# Allegro board SUB_GM7123C_RGB TO VGA_V1_0-0717-1408.brd
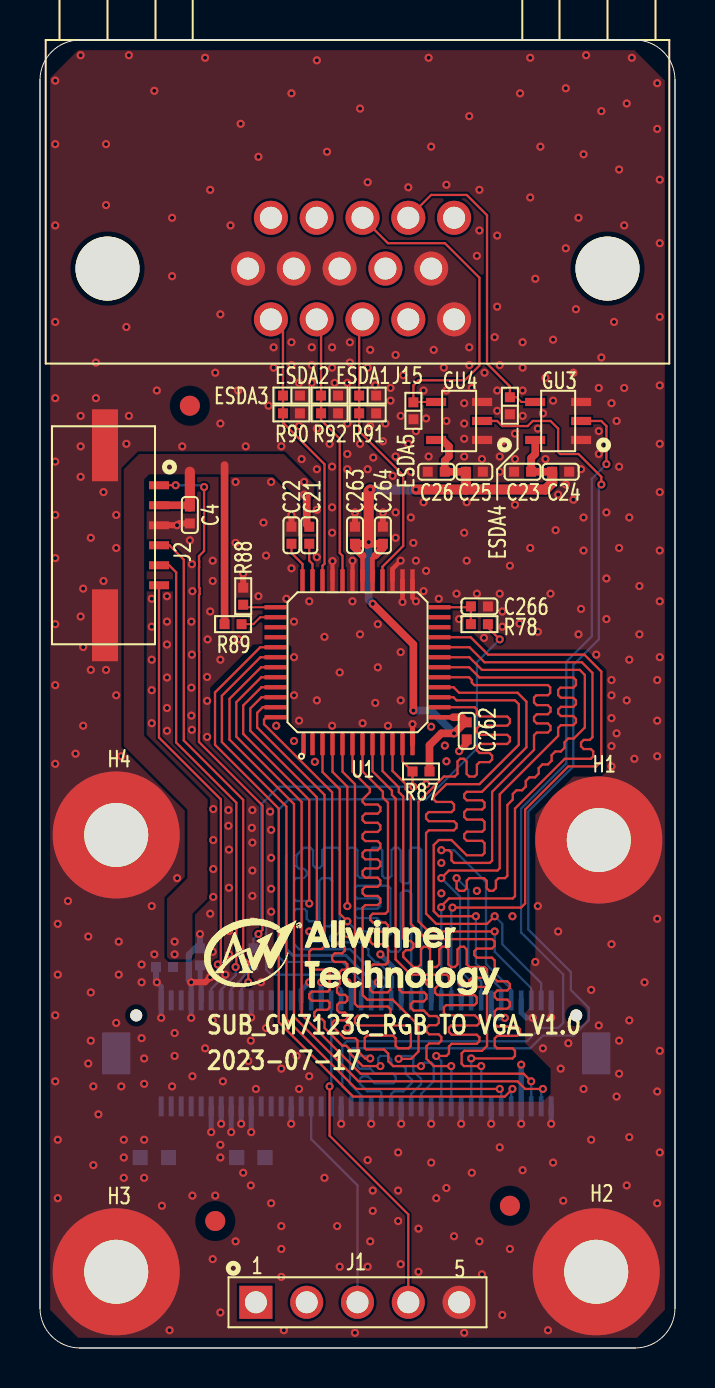
[diagram p0: board, top side]
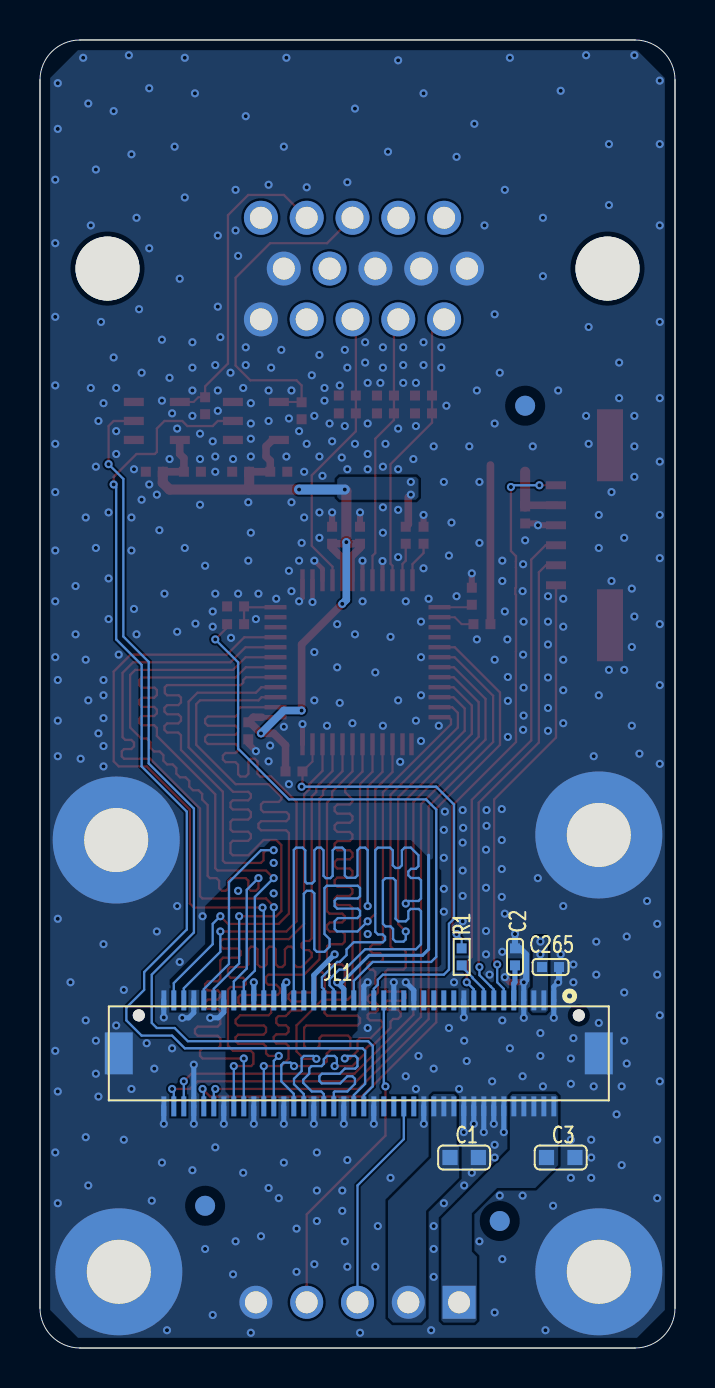
[diagram p1: board, bottom side, seen from below]

Outline 31.75 x 65.41 mm; copper layers: TOP, GND02, GND03, BOTTOM. Coordinates in mm from the lower left corner of the outline.
Outline path: 0,63.41 0,2 ; 0,63.41 arc(0.59,64.82) 2,65.41 ; 0,63.41 0,2 ; 0,2 arc(0.59,0.59) 2,0 ; 2,65.41 29.75,65.41 ; 2,65.41 29.75,65.41 ; 29.75,65.41 arc(31.16,64.82) 31.75,63.41 ; 2,0 29.75,0 ; 2,0 29.75,0 ; 29.75,0 arc(31.16,0.59) 31.75,2 ; 31.75,63.41 31.75,2 ; 31.75,63.41 31.75,2

## Design rules (mm)
net group LCD-CLK: nets LCD-CLK RGB/CLK
nets with their own width: min track width 0.305; nets GND

## Placement (name value [footprint] x y rotation side)
C1  22uF-16V  [C0603]  10.54 9.53 180 bottom
C2  100nF-16V  [C0402]  8 19.56 90 bottom
C3  22uF-25V  [C0603]  5.71 9.53 180 bottom
C4  4.7uF-16V  [C0402]  7.49 41.66 270 top
C21  100nF-16V  [C0402]  13.46 40.64 90 top
C22  100nF-16V  [C0402]  12.57 40.64 90 top
C23  100nF-16V  [C0402]  24.13 43.81 180 top
C24  10nF-16V  [C0402]  26.04 43.81 0 top
C25  100nF-16V  [C0402]  21.72 43.81 0 top
C26  10nF-16V  [C0402]  19.81 43.81 180 top
C262  100nF-16V  [C0402]  21.34 30.86 270 top
C263  100nF-16V  [C0402]  15.75 40.64 90 top
C264  10uFF-16V  [C0402]  17.14 40.64 90 top
C265  100nF-16V  [C0402]  6.22 19.05 180 bottom
C266  NC/10pF-16V  [C0402]  21.97 37.08 0 top
ESDA1  ESD9B5V-2/TR  [ESD0402]  16.38 47.62 0 top
ESDA2  ESD9B5V-2/TR  [ESD0402]  14.48 47.62 0 top
ESDA3  ESD9B5V-2/TR  [ESD0402]  12.57 47.62 0 top
ESDA4  ESD9B5V-2/TR  [ESD0402]  23.5 47.12 270 top
ESDA5  ESD9B5V-2/TR  [ESD0402]  18.67 46.86 270 top
GU3  NC7SZ125  [SOT5P95B160_292H145]  25.91 46.35 180 top
GU4  NC7SZ125  [SOT5P95B160_292H145]  20.95 46.35 180 top
H1  NC-HOLE  [MTH635D320]  27.94 25.4 0 top
H2  NC-HOLE  [MTH635D320]  27.81 3.81 0 top
H3  NC-HOLE  [MTH635D320]  3.81 3.81 0 top
H4  NC-HOLE  [MTH635D320]  3.81 25.65 0 top
J1  CON1X5-2.54-F-DIP  [SKT1_5P254B250_1290H850]  15.88 2.29 0 top
J2  CTP_CN  [FPC8P100B515_1090H340_B]  3.17 40.64 270 top
J15  DB-15F  [DB15P229B2175_3080H1255]  15.88 57.32 180 top
JL1  DF17(2.0)-80DP-0.5V  [SKT2_40P50B570_2500H350]  15.81 14.73 0 bottom
NOREF  -  []  -57.71 -63.22 0 top
NOREF#2  -  []  1.98 0 90 top
NOREF#3  -  []  0 2 0 top
NOREF#4  -  []  8.13 17.27 0 top
NOREF#5  -  [unnamed#2]  7.49 47.12 0 top
NOREF#6  -  [unnamed#2]  23.5 7.11 0 top
NOREF#7  -  [unnamed#2]  8.76 6.35 0 top
NOREF#8  -  [unnamed#2]  8.76 6.35 180 bottom
NOREF#9  -  [unnamed#2]  7.49 47.12 180 bottom
NOREF#10  -  [unnamed#2]  23.5 7.11 180 bottom
R1  0R  [R0402]  10.67 19.56 90 bottom
R78  0R  [R0402]  21.97 36.2 180 top
R87  1K  [R0402]  19.05 28.83 0 top
R88  530R  [R0402]  10.16 37.59 90 top
R89  4.7K  [R0402]  9.65 36.2 180 top
R90  75R  [R0402]  12.57 46.74 0 top
R91  75R  [R0402]  16.38 46.74 0 top
R92  75R  [R0402]  14.48 46.74 0 top
U1  GM7123C  [QFP48P50B700X700H170]  15.88 34.29 90 top

## Library data of the parts
C1-C3 C21-C26 C262-C265 = CAPACITOR_0: room: LVDS
C4 = C-C0402: room: EMMC
C266 = CAPACITOR_0: signal model: CAPACITOR_0_C0402_NC/10PF-16V_NC/10pF-16V; room: LVDS
ESDA1-ESDA5 = 1_1.5KE100A
GU3 GU4 = LP3985IM5-3_0.3
H1-H4 = HOLE
J1 = CON1X5-2.54-F-DIP
J2 = CTP_CN_2
J15 = DB-15_1
JL1 = DF17-3.0-80DS-0.5V
R1 = R-R0402-5%
R78 = R-R0603_1: signal model: R-R0603_1_R0402_0R_0R
R87-R92 = R-R0603
U1 = GM7123C

## Footprints (pads in the part's own frame, mm; a bottom-side part is the same pattern mirrored in y, then rotated)
C0402
  rect 0.5x0.5 smd: 1(-0.425,0) 2(0.425,0)
C0603
  rect 0.759x0.759 smd: 1(-0.71,0) 2(0.71,0)
DB15P229B2175_3080H1255
  round 3.2 hole 3.2 unplated: (-12.5,3.34) (12.5,3.34)
  round 1.7 hole 1.1: 1(4.33,5.88) 2(2.04,5.88) 3(-0.25,5.88) 4(-2.54,5.88) 5(-4.83,5.88) 6(5.475,3.34) 7(3.185,3.34) 8(0.895,3.34) 9(-1.395,3.34) 10(-3.685,3.34) 11(4.33,0.8) 12(2.04,0.8) 13(-0.25,0.8) 14(-2.54,0.8) 15(-4.83,0.8)
ESD0402
  rect 0.5x0.5 smd: 1(-0.425,0) 2(0.425,0)
FPC8P100B515_1090H340_B
  rect 0.4x1 smd: 1(-2.5,2.775) 2(-1.5,2.775) 3(-0.5,2.775) 4(0.5,2.775) 5(1.5,2.775) 6(2.5,2.775)
  rect 3.6x1.3 smd: 7(4.5,0.075) 8(-4.5,0.075)
MTH635D320
  round 6.35 hole 3.2: 1(0,0)
QFP48P50B700X700H170
  rect 1.1x0.22 smd: 1(-4.1,2.7) 2(-4.1,2.25) 3(-4.1,1.75) 4(-4.1,1.25) 5(-4.1,0.75) 6(-4.1,0.25) 7(-4.1,-0.25) 8(-4.1,-0.75) 9(-4.1,-1.25) 10(-4.1,-1.75) 11(-4.1,-2.25) 12(-4.1,-2.75) 25(4.1,-2.75) 26(4.1,-2.25) 27(4.1,-1.75) 28(4.1,-1.25) 29(4.1,-0.75) 30(4.1,-0.25) 31(4.1,0.25) 32(4.1,0.75) 33(4.1,1.25) 34(4.1,1.75) 35(4.1,2.25) 36(4.1,2.75)
  rect 0.22x1.1 smd: 13(-2.75,-4.1) 14(-2.25,-4.1) 15(-1.75,-4.1) 16(-1.25,-4.1) 17(-0.75,-4.1) 18(-0.25,-4.1) 19(0.25,-4.1) 20(0.75,-4.1) 21(1.25,-4.1) 22(1.75,-4.1) 23(2.25,-4.1) 24(2.75,-4.1) 37(2.75,4.1) 38(2.25,4.1) 39(1.75,4.1) 40(1.25,4.1) 41(0.75,4.1) 42(0.25,4.1) 43(-0.25,4.1) 44(-0.75,4.1) 45(-1.25,4.1) 46(-1.75,4.1) 47(-2.25,4.1) 48(-2.75,4.1)
R0402
  rect 0.5x0.5 smd: 1(-0.425,0) 2(0.425,0)
SKT1_5P254B250_1290H850
  rect 1.651x1.651 hole 1.1: 1(-5.08,0)
  round 1.651 hole 1.1: 2(-2.54,0) 3(0,0) 4(2.54,0) 5(5.08,0)
SKT2_40P50B570_2500H350
  round 0.6 hole 0.6 unplated: (-11,-1.9) (11,-1.9)
  rect 0.25x1 smd: 1(-9.75,-2.65) 2(-9.75,2.65) 3(-9.25,-2.65) 4(-9.25,2.65) 5(-8.75,-2.65) 6(-8.75,2.65) 7(-8.25,-2.65) 8(-8.25,2.65) 9(-7.75,-2.65) 10(-7.75,2.65) 11(-7.25,-2.65) 12(-7.25,2.65) 13(-6.75,-2.65) 14(-6.75,2.65) 15(-6.25,-2.65) 16(-6.25,2.65) 17(-5.75,-2.65) 18(-5.75,2.65) 19(-5.25,-2.65) 20(-5.25,2.65) 21(-4.75,-2.65) 22(-4.75,2.65) 23(-4.25,-2.65) 24(-4.25,2.65) 25(-3.75,-2.65) 26(-3.75,2.65) 27(-3.25,-2.65) 28(-3.25,2.65) 29(-2.75,-2.65) 30(-2.75,2.65) 31(-2.25,-2.65) 32(-2.25,2.65) 33(-1.75,-2.65) 34(-1.75,2.65) 35(-1.25,-2.65) 36(-1.25,2.65) 37(-0.75,-2.65) 38(-0.75,2.65) 39(-0.25,-2.65) 40(-0.25,2.65) 41(0.25,-2.65) 42(0.25,2.65) 43(0.75,-2.65) 44(0.75,2.65) 45(1.25,-2.65) 46(1.25,2.65) 47(1.75,-2.65) 48(1.75,2.65) 49(2.25,-2.65) 50(2.25,2.65) 51(2.75,-2.65) 52(2.75,2.65) 53(3.25,-2.65) 54(3.25,2.65) 55(3.75,-2.65) 56(3.75,2.65) 57(4.25,-2.65) 58(4.25,2.65) 59(4.75,-2.65) 60(4.75,2.65) 61(5.25,-2.65) 62(5.25,2.65) 63(5.75,-2.65) 64(5.75,2.65) 65(6.25,-2.65) 66(6.25,2.65) 67(6.75,-2.65) 68(6.75,2.65) 69(7.25,-2.65) 70(7.25,2.65) 71(7.75,-2.65) 72(7.75,2.65) 73(8.25,-2.65) 74(8.25,2.65) 75(8.75,-2.65) 76(8.75,2.65) 77(9.25,-2.65) 78(9.25,2.65) 79(9.75,-2.65) 80(9.75,2.65)
  rect 1.4x2.1 smd: 81(12,0) 82(-12,0)
SOT5P95B160_292H145
  rect 1x0.41 smd: 1(-1.15,0.95) 2(-1.15,0) 3(-1.15,-0.95) 4(1.15,-0.95) 5(1.15,0.95)
unnamed#2
  round 1 smd: 1(0,0)

## Nets
GND: C1.2 C2.2 C3.2 C4.2 C22.2 C23.2 C24.2 C25.2 C26.2 C262.2 C263.2 C264.2 C265.2 C266.2 ESDA1.2(CATHODE) ESDA2.2(CATHODE) ESDA3.2(CATHODE) ESDA4.2(CATHODE) ESDA5.2(CATHODE) GU3.1(/OE) GU3.3(GND) GU4.1(/OE) GU4.3(GND) H1.1 H2.1 H3.1 H4.1 J1.5 J2.3(GND) J2.7(GND0) J2.8(GND1) J15.5 J15.6 J15.7 J15.8 J15.10 JL1.1(P1) JL1.7(P7) JL1.12(P12) JL1.14(P14) JL1.16(P16) JL1.18(P18) JL1.19(P19) JL1.20(P20) JL1.28(P28) JL1.29(P29) JL1.33(P33) JL1.38(P38) JL1.39(P39) JL1.43(P43) JL1.44(P44) JL1.49(P49) JL1.50(P50) JL1.55(P55) JL1.56(P56) JL1.61(P61) JL1.62(P62) JL1.67(P67) JL1.68(P68) JL1.73(P73) JL1.74(P74) JL1.79(P79) JL1.80(P80) JL1.81(GND0) JL1.82(GND1) R88.2 R90.2 R91.2 R92.2 U1.12(SYNC) U1.25(GND0) U1.26(GND1) U1.27(IOB-) U1.31(IOG-) U1.33(IOR-)
VCC-5V: C1.1 J1.2 JL1.22(P22) JL1.24(P24) JL1.26(P26)
VCCIO-LCD1: C2.1 JL1.9(P9)
CTP-INT: J2.4(INT) JL1.17(P17)
CTP-RST: J2.1(RST) R1.2
CTP-SCK: J2.6(SCL) JL1.11(P11)
CTP-SDA: J2.5(SDA) JL1.13(P13)
DCIN-12V: C3.1 J1.1 JL1.2(P2) JL1.4(P4) JL1.6(P6) JL1.8(P8) JL1.10(P10)
GM7123C-3V3: C4.1 C21.2 C23.1 C24.1 C25.1 C26.1 C262.1 C263.1 C264.1 C265.1 GU3.5(VCC) GU4.5(VCC) J2.2(VCC) JL1.3(P3) JL1.5(P5) R87.2 R89.2 U1.13(VDD0) U1.29(VDD1) U1.30(VDD2)
LCD-BL-PWM: J1.4 JL1.35(P35)
LCD-BL-PWREN: J1.3 JL1.32(P32)
LCD-CLK: JL1.41(P41) R78.1
LCD-D0: JL1.75(P75) U1.14(B0)
LCD-D1: JL1.77(P77) U1.15(B1)
LCD-D2: JL1.69(P69) U1.16(B2)
LCD-D3: JL1.71(P71) U1.17(B3)
LCD-D4: JL1.63(P63) U1.18(B4)
LCD-D5: JL1.65(P65) U1.19(B5)
LCD-D6: JL1.57(P57) U1.20(B6)
LCD-D7: JL1.59(P59) U1.21(B7)
LCD-D8: JL1.51(P51) U1.3(G2)
LCD-D9: JL1.53(P53) U1.4(G3)
LCD-D10: JL1.54(P54) U1.5(G4)
LCD-D11: JL1.52(P52) U1.6(G5)
LCD-D12: JL1.60(P60) U1.7(G6)
LCD-D13: JL1.58(P58) U1.8(G7)
LCD-D14: JL1.66(P66) U1.9(G8)
LCD-D15: JL1.64(P64) U1.10(G9)
LCD-D16: JL1.72(P72) U1.41(R2)
LCD-D17: JL1.70(P70) U1.42(R3)
LCD-D18: JL1.78(P78) U1.43(R4)
LCD-D19: JL1.76(P76) U1.44(R5)
LCD-D20: JL1.47(P47) U1.45(R6)
LCD-D21: JL1.45(P45) U1.46(R7)
LCD-D22: JL1.48(P48) U1.47(R8)
LCD-D23: JL1.46(P46) U1.48(R9)
LCD-DE: JL1.37(P37) R87.1 U1.11(BLANK)
LCD-HSYNC: GU4.2(A) JL1.42(P42)
LCD-VSYNC: GU3.2(A) JL1.40(P40)
RGB/CLK: C266.1 R78.2 U1.24(CLK)
VGA-B: ESDA1.1(ANODE) J15.3 R91.1 U1.28(IOB+)
VGA-G: ESDA2.1(ANODE) J15.2 R92.1 U1.32(IOG+)
VGA-HSYNC: ESDA5.1(ANODE) GU4.4(Y) J15.13
VGA-R: ESDA3.1(ANODE) J15.1 R90.1 U1.34(IOR+)
VGA-VSYNC: ESDA4.1(ANODE) GU3.4(Y) J15.14
N34352813: C21.1 U1.35(COMP)
N34352829: C22.1 U1.36(VREF)
N34352843: R88.1 U1.37(RSET)
N34352862: R89.1 U1.38(PSAVE)
N34482451: JL1.15(P15) R1.1

Pads without a net: J15 4 9 11 12 15; JL1 21 23 25 27 30 31 34 36; NOREF#5 1; NOREF#6 1; NOREF#7 1; NOREF#8 1; NOREF#9 1; NOREF#10 1; U1 1 2 22 23 39 40

## Via types
v1: diameter 0.406, hole 0.203, TOP to BOTTOM, 537 vias

## Routing (per net, layer and track width the routed paths; a pad name or vN(x,y) marks a point on that pad's centre or on a via; arc(x,y) is an arc through that point)
GND: length 58.2
  TOP w0.203: U1.31 v1(15.63,39.37) ; U1.33 v1(14.63,39.35)
  TOP w0.229: U1.26 v1(18.12,37.3) ; U1.25 18.63,37.51 v1(18.8,37.34) ; U1.27 17.63,38.96 v1(18.03,39.37)
  TOP w0.254: U1.12 v1(18.63,31.2)
  TOP w0.305: C4.2 6.94,41.23 v1(6.85,41.14) J2.3 ; C22.2 v1(12.57,41.66) ; v1(20.95,29.84) 21.34,30.23 C262.2 ; v1(8.51,18.54) 8.26,18.29 v1(7.56,18.29) ; R88.2 v1(10.16,38.73) ; C264.2 v1(17.14,41.78) ; C263.2 v1(15.75,41.78)
  BOTTOM w0.152: v1(16.89,18.29) 16.64,18.29 15.29,19.63 12.62,19.63 12.32,19.94 12.32,24.64
  BOTTOM w0.254: JL1.67 22.56,16.78 22.83,16.51 v1(23.24,16.51) ; JL1.50 v1(18.06,11.21) ; v1(7.56,18.29) JL1.7 v1(7.56,16.51) ; v1(15.37,18.29) 15.56,18.09 JL1.39 ; v1(24.06,11.21) JL1.74 v1(24.06,14.17) ; JL1.44 v1(16.56,11.21) ; JL1.16 v1(9.56,10.79) ; JL1.29 13.06,17.89 v1(13.46,18.29) ; JL1.68 v1(22.56,11.21) ; v1(6.06,16.51) JL1.1 6.06,18.07 v1(5.84,18.29) ; JL1.73 24.06,16.76 24.31,16.51 v1(24.64,16.51) ; JL1.19 v1(10.56,16.53) ; JL1.33 v1(14.06,18.29) ; JL1.18 v1(10.06,11.21) ; JL1.49 18.06,18.64 v1(17.02,19.68) ; JL1.14 v1(9.06,11.21) ; JL1.56 v1(19.56,11.21) ; v1(21.06,18.29) JL1.61 ; JL1.12 v1(8.56,10.79) ; JL1.55 19.56,18.16 v1(19.43,18.29) ; JL1.38 v1(15.06,11.21) ; JL1.43 16.56,17.96 v1(16.89,18.29) ; JL1.28 v1(12.56,11.21) ; JL1.62 v1(21.06,11.21) ; JL1.80 v1(25.56,11.21) ; JL1.20 v1(10.56,10.79) ; JL1.79 v1(25.56,16.53)
  BOTTOM w0.305: v1(5.84,18.29) 5.8,18.33 C265.2 ; v1(8,20.7) C2.2 7.75,19.98 7.44,19.68 7.44,18.41 v1(7.56,18.29)
  vias: v1(0.76,63.37) v1(0.76,60.2) v1(0.76,56.13) v1(0.76,51.31) v1(0.76,47.5) v1(0.76,44.32) v1(0.76,41.66) v1(0.76,39.5) v1(0.76,36.2) v1(0.76,33.15) v1(0.76,29.21) v1(0.76,16.64) v1(0.76,13.34) v1(0.89,21.21) v1(0.89,18.67) v1(0.89,10.41) v1(0.89,7.49) v1(1.4,22.35) v1(1.78,29.72) v1(2.03,64.64) v1(2.03,46.61) v1(2.03,45.09) v1(2.03,43.56) v1(2.03,36.58) v1(2.16,37.97) v1(2.16,35.05) v1(2.16,31.11) v1(2.41,20.57) v1(2.41,14.22) v1(2.54,40.51) v1(2.54,33.91) v1(2.54,17.78) v1(2.54,15.37) v1(2.67,13.08) v1(2.67,9.14) v1(2.79,49.28) v1(2.79,47.5) v1(2.92,11.68) v1(3.17,42.8) v1(3.17,38.35) v1(3.3,60.2) v1(3.3,57.15) v1(3.3,33.91) v1(3.81,41.66) v1(3.81,40.01) v1(3.81,32.64) v1(3.81,16.26) v1(3.94,20.32) v1(3.94,18.67) v1(4.06,29.59) v1(4.06,13.08) v1(4.19,10.41) v1(4.19,9.53) v1(4.19,8.51) v1(4.32,51.05) v1(4.32,45.21) v1(4.45,64.64) v1(4.45,46.61) v1(5.08,19.18) v1(5.08,18.29) v1(5.08,15.49) v1(5.21,14.48) v1(5.21,13.21) v1(5.21,10.41) v1(5.21,8.51) v1(5.59,37.47) v1(5.59,36.07) v1(5.59,34.42) v1(5.59,32.89) v1(5.59,31.24) v1(5.59,22.1) v1(5.71,62.87) v1(5.71,19.68) v1(5.84,47.88) v1(6.1,7.11) v1(6.35,37.59) v1(6.35,36.32) v1(6.35,35.18) v1(6.35,33.53) v1(6.35,32) v1(6.35,30.86) v1(6.48,0.89) v1(6.6,56.52) v1(6.6,53.59) v1(6.6,13.08) v1(6.73,15.75) v1(6.73,14.61) v1(6.86,23.5) v1(7.11,45.09) v1(7.49,40.39) v1(7.59,39.19) v1(7.62,37.85) v1(7.57,36.32) v1(7.59,34.67) v1(7.57,33.02) v1(7.57,31.62) v1(7.59,30.91) v1(7.62,13.59) v1(7.62,7.62) v1(8.26,64.52) v1(8.26,14.99) v1(8.38,35.43) v1(8.36,33.55) v1(8.36,32.36) v1(8.36,30.56) v1(8.51,57.91) v1(8.51,36.83) v1(8.51,21.72) v1(8.64,39.37) v1(8.64,38.35) v1(8.64,19.81) v1(8.64,16.38) v1(8.64,4.45) v1(8.66,26.95) v1(8.66,25.4) v1(8.66,23.95) v1(8.66,22.56) v1(8.76,48.77) v1(8.76,7.62) v1(9.02,51.69) v1(9.02,46.23) v1(9.02,34.42) v1(9.02,10.16) v1(9.02,9.53) v1(9.02,1.78) v1(9.14,13.34) v1(9.27,18.67) v1(9.42,26.9) v1(9.42,26.11) v1(9.45,24.92) v1(9.45,23.01) v1(9.45,20.85) v1(9.45,19.68) v1(9.53,56.13) v1(9.78,43.31) v1(9.78,40.26) v1(9.78,5.33) v1(9.91,47.88) v1(9.91,35.43) v1(10.03,61.21) v1(10.16,8.76) v1(10.29,45.09) v1(10.41,14.35) v1(10.54,15.37) v1(10.54,8.13) v1(10.62,26.9) v1(10.59,26.01) v1(10.62,25.27) v1(10.62,23.88) v1(10.62,22.61) v1(10.62,21.34) v1(10.79,12.95) v1(10.92,59.56) v1(10.92,37.59) v1(11.05,18.29) v1(11.18,41.27) v1(11.3,39.62) v1(11.3,16) v1(11.43,47.12) v1(11.51,26.82) v1(11.56,43.31) v1(11.56,25.91) v1(11.56,24.51) v1(11.56,22.96) v1(11.56,21.82) v1(11.56,7.24) v1(11.68,50.04) v1(11.68,49.02) v1(11.81,31.11) v1(12.06,45.09) v1(12.06,13.97) v1(12.06,6.1) v1(12.06,4.95) v1(12.06,3.56) v1(12.19,0.89) v1(12.32,37.47) v1(12.57,62.74) v1(12.57,50.29) v1(12.57,49.15) v1(12.57,38.99) v1(12.7,36.32) v1(12.7,34.54) v1(12.7,32.64) v1(12.7,30.35) v1(12.83,14.61) v1(12.95,48.26) v1(12.95,46.1) v1(12.95,31.37) v1(12.95,12.95) v1(13.08,44.45) v1(13.46,37.34) v1(13.46,13.59) v1(13.59,50.04) v1(13.59,49.15) v1(13.59,48.26) v1(13.74,29.31) v1(13.84,64.39) v1(13.84,45.97) v1(13.84,43.94) v1(13.84,41.91) v1(13.84,39.55) v1(13.84,32.38) v1(14.22,35.56) v1(14.22,8.51) v1(14.35,59.82) v1(14.48,45.21) v1(14.61,50.04) v1(14.61,49.02) v1(14.61,44.07) v1(14.61,42.04) v1(14.61,40.77) v1(14.61,31.11) v1(14.73,48.26) v1(14.86,6.1) v1(14.99,33.78) v1(14.99,4.06) v1(15.37,48.26) v1(15.37,46.23) v1(15.37,44.7) v1(15.37,43.94) v1(15.37,16) v1(15.49,50.29) v1(15.49,49.28) v1(15.62,37.34) v1(15.75,0.76) v1(16,61.98) v1(16,45.21) v1(16,35.69) v1(16.13,31.24) v1(16.38,58.29) v1(16.38,49.02) v1(16.38,43.94) v1(16.38,9.4) v1(16.38,4.06) v1(16.51,49.91) v1(16.51,46.1) v1(16.51,5.33) v1(16.64,7.87) v1(16.64,6.86) v1(16.66,44.53) v1(16.76,48.13) v1(16.76,32.26) v1(16.89,36.2) v1(16.89,34.04) v1(17.14,45.34) v1(17.27,46.23) v1(17.4,31.11) v1(17.53,48.01) v1(17.53,47.37) v1(17.63,43.61) v1(17.78,49.66) v1(17.78,44.58) v1(17.78,41.78) v1(17.78,40.51) v1(17.91,9.78) v1(17.91,7.87) v1(17.91,6.35) v1(18.03,46.61) v1(18.03,34.8) v1(18.03,32.38) v1(18.03,4.19) v1(18.16,48.64) v1(18.41,58.04) v1(18.41,45.21) v1(18.54,43.81) v1(18.54,41.53) v1(18.67,40.26) v1(18.8,45.85) v1(18.8,39.37) v1(18.92,5.97) v1(18.92,3.81) v1(19.18,47.88) v1(19.18,42.29) v1(19.18,37.85) v1(19.3,46.48) v1(19.3,38.86) v1(19.3,28.19) v1(19.43,64.52) v1(19.43,44.58) v1(19.56,60.07) v1(19.56,31.06) v1(19.56,9.27) v1(19.68,49.91) v1(19.81,7.49) v1(19.94,37.47) v1(20.07,24.26) v1(20.07,22.73) v1(20.19,49.02) v1(20.24,30.12) v1(20.32,58.17) v1(20.32,47.88) v1(20.32,46.35) v1(20.32,29.34) v1(20.32,8) v1(20.7,5.59) v1(20.83,37.72) v1(20.95,36.45) v1(21.21,47.24) v1(21.21,46.23) v1(21.21,45.47) v1(21.21,44.58) v1(21.21,40.77) v1(21.21,0.76) v1(21.34,42.29) v1(21.34,39.37) v1(21.46,61.59) v1(21.46,50.04) v1(21.46,49.15) v1(21.59,48.01) v1(21.59,8.76) v1(21.84,54.61) v1(21.84,37.72) v1(21.84,22.86) v1(21.97,57.91) v1(21.97,55.88) v1(21.97,5.33) v1(22.1,44.45) v1(22.1,3.68) v1(22.23,48.77) v1(22.2,35.51) v1(22.73,50.55) v1(22.86,55.63) v1(22.86,52.07) v1(22.86,47.88) v1(22.86,46.86) v1(22.99,49.15) v1(22.99,44.58) v1(22.99,43.81) v1(22.99,37.72) v1(22.99,10.03) v1(23.11,45.34) v1(23.11,36.83) v1(23.11,36.07) v1(23.11,1.65) v1(23.5,39.12) v1(23.5,4.95) v1(23.62,21.59) v1(23.75,45.72) v1(23.75,44.45) v1(23.75,42.16) v1(24,62.74) v1(23.98,36.22) v1(24.13,50.29) v1(24.13,49.02) v1(24.13,47.88) v1(24.13,46.61) v1(24.13,8.89) v1(24.51,64.52) v1(24.51,57.53) v1(24.51,40.01) v1(24.77,53.47) v1(24.77,19.3) v1(24.89,45.97) v1(24.89,35.81) v1(24.89,22.1) v1(25.02,60.07) v1(25.15,46.74) v1(25.15,14.99) v1(25.27,48.51) v1(25.27,44.45) v1(25.4,0.89) v1(25.53,37.72) v1(25.65,50.42) v1(25.65,47.37) v1(25.65,9.27) v1(25.78,40.89) v1(25.91,42.67) v1(25.91,20.83) v1(26.04,13.97) v1(26.16,7.37) v1(26.29,62.99) v1(26.29,54.99) v1(26.29,43.18) v1(26.42,15.24) v1(26.67,48.77) v1(26.67,42.42) v1(26.8,51.94) v1(26.92,56.52) v1(26.92,35.69) v1(27.05,43.94) v1(27.05,36.96) v1(27.18,59.69) v1(27.18,41.53) v1(27.18,39.88) v1(27.18,12.95) v1(27.3,64.64) v1(27.56,17.91) v1(27.56,10.41) v1(27.81,34.67) v1(27.94,48.01) v1(27.94,45.85) v1(27.94,44.7) v1(27.94,16.13) v1(28.07,61.85) v1(28.07,49.53) v1(28.32,41.78) v1(28.32,38.48) v1(28.32,36.45) v1(28.57,47.24) v1(28.57,33.4) v1(28.57,32.64) v1(28.57,31.5) v1(28.57,30.1) v1(28.57,29.08) v1(28.57,20.19) v1(28.7,51.31) v1(28.83,46.35) v1(28.83,30.73) v1(28.83,12.57) v1(28.96,58.93) v1(28.96,44.07) v1(28.96,40.01) v1(28.96,15.37) v1(28.96,13.72) v1(29.21,56.13) v1(29.21,48.01) v1(29.34,62.23) v1(29.34,32.38) v1(29.34,8.13) v1(29.46,41.53) v1(29.46,34.42) v1(29.46,16.38) v1(29.46,10.54) v1(29.59,64.52) v1(29.72,29.46) v1(29.97,38.1) v1(29.97,35.69) v1(30.23,18.29) v1(30.86,63.25) v1(30.86,60.96) v1(30.86,33.4) v1(30.86,31.37) v1(30.86,29.59) v1(30.86,21.46) v1(30.86,12.83) v1(30.86,7.24) v1(30.99,58.42) v1(30.99,55.24) v1(30.99,51.56) v1(30.99,48.13) v1(30.99,45.21) v1(30.99,42.8) v1(30.99,39.88) v1(30.99,37.34) v1(30.99,34.54) v1(30.99,14.86) v1(30.99,9.78)
VCCIO-LCD1: length 1.8
  BOTTOM w0.254: JL1.9 8.06,18.23 8,18.29 C2.1
CTP-INT: length 25.1
  TOP w0.114: J2.4 6.47,40.14 7.19,39.42 7.19,30.38 10.16,27.41 10.16,19.56 10.41,19.3 v1(10.41,18.29)
  BOTTOM w0.114: v1(10.41,18.29) 10.06,17.93 JL1.17
CTP-RST: length 27
  TOP w0.102: J2.1 v1(6.78,43.14)
  TOP w0.114: v1(8.2,43.05) 8.2,39.85 7.95,39.6 7.95,39.35 7.96,39.34 7.96,39.04 7.95,39.04 7.95,38.03 7.98,38 7.98,37.7 7.95,37.66 7.95,34.83 7.96,34.82 7.96,30.76 7.95,30.76 7.95,30.3 11.13,27.13 11.13,20.9 v1(10.92,20.7)
  BOTTOM w0.102: R1.2 10.67,20.45 v1(10.92,20.7)
  BOTTOM w0.114: v1(6.78,43.14) 8.04,43.14 8.13,43.05 v1(8.2,43.05)
CTP-SCK: length 22.2
  TOP w0.114: v1(8.89,19.18) 9.04,19.33 9.04,27.43 5.95,30.52 J2.6
  BOTTOM w0.114: JL1.11 8.56,17.96 8.89,18.29 v1(8.89,19.18)
CTP-SDA: length 24
  TOP w0.114: v1(9.78,19.05) 9.82,19.09 9.82,27.27 6.81,30.28 6.81,38.79 6.45,39.14 J2.5
  BOTTOM w0.114: v1(9.78,19.05) 9.78,18.65 9.22,18.08 9.22,18.08 9.06,17.92 JL1.13
GM7123C-3V3: length 54.6
  TOP w0.203: 20.66,31.54 U1.13
  TOP w0.229: 16.76,39.62 16.63,39.49 U1.29 ; U1.30 16.12,39.62 16.13,39.62
  TOP w0.381: 13.34,42.55 13.34,41.19 C21.2 ; GU4.5 20.13,45.41 20.45,45.09 20.45,44.58 20.24,44.37 C26.1 C25.1 ; 16.76,39.62 17.14,40.01 C264.1 C263.1 15.75,40.01 16.13,39.62 ; 20.66,31.54 21.08,31.54 C262.1 21.25,31.29 v1(20.7,30.73) 20.07,30.73 19.47,30.14 R87.2 ; v1(16.64,37.21) 18.67,35.18 v1(18.67,31.88) ; J2.2 7.43,42.14 C4.1 ; GU3.5 24.77,45.4 24.77,44.7 24.55,44.49 C23.1 C24.1 ; 9.23,44.15 R89.2
  TOP w0.508: 21.29,42.93 v1(18.8,42.93) ; 21.29,42.93 C25.1 ; 21.29,42.93 25.27,42.93 25.61,43.26 C24.1 ; v1(16.51,42.93) 16.43,42.85 v1(16.43,40.3) 16.35,40.22 ; C4.1 7.49,43.81
  BOTTOM w0.381: v1(18.67,31.88) 19.56,31.88 v1(20.7,30.73) ; v1(16.43,40.3) 16.43,37.41 v1(16.64,37.21)
  BOTTOM w0.508: v1(16.51,42.93) v1(18.8,42.93)
  vias: v1(6.73,20.32) v1(6.73,19.68) v1(13.21,43.31) v1(13.21,42.67)
LCD-BL-PWM: length 16.8
  TOP w0.114: J1.4 18.41,6.68 14.48,10.62 v1(14.48,13.08)
  BOTTOM w0.114: v1(14.48,13.08) 14.56,13.16 JL1.35
LCD-BL-PWREN: length 10.8
  BOTTOM w0.114: JL1.32 13.56,10.44 15.88,8.13 J1.3
LCD-CLK: length 31.1
  TOP w0.114: v1(22.99,35.43) 22.4,36.02 R78.1
  BOTTOM w0.114: v1(22.99,35.43) 21.84,34.29 21.84,29.97 19.3,27.43 12.45,27.43 11.94,26.92 11.94,19.56 12.19,19.3 15.11,19.3 16.06,18.36 JL1.41
LCD-D0: length 31.5
  TOP w0.114: v1(22.73,20.83) 19.43,20.83 18.92,21.34 18.92,27.3 19.45,27.83 19.45,27.83 20.2,28.57 20.74,28.57 20.87,28.71 20.87,29.33 21.01,29.46 21.2,29.46 21.33,29.33 21.33,28.71 21.46,28.57 21.73,28.57 21.84,28.69 21.84,29.16 21.98,29.3 22.47,29.3 22.61,29.43 22.61,29.62 22.47,29.75 21.98,29.75 21.84,29.89 21.84,30.07 21.98,30.2 23.36,30.2 23.5,30.34 23.5,30.53 23.36,30.66 21.98,30.66 21.84,30.8 21.84,30.98 21.98,31.12 23.36,31.12 23.5,31.25 23.5,31.44 23.36,31.58 21.98,31.58 21.84,31.71 21.84,31.93 21.73,32.04 U1.14
  BOTTOM w0.114: v1(22.73,20.83) 22.73,19.81 24.56,17.98 JL1.75
LCD-D1: length 31.1
  TOP w0.114: U1.15 20.67,32.54 20.83,32.38 23.75,32.38 23.94,32.19 23.94,30.16 21.97,28.19 20.32,28.19 19.68,27.56 19.68,27.43 19.81,27.3 20.57,27.3 20.7,27.18 20.7,26.92 20.57,26.8 19.43,26.8 19.3,26.67 19.3,26.48 19.44,26.34 20.69,26.34 20.83,26.21 20.83,26.02 20.69,25.89 19.44,25.89 19.3,25.75 19.3,21.72 19.81,21.21 22.35,21.21 v1(22.73,21.59)
  BOTTOM w0.114: JL1.77 25.06,18.25 23.11,20.19 23.11,21.21 v1(22.73,21.59)
LCD-D2: length 31.6
  TOP w0.114: v1(21.79,21.59) 19.94,21.59 19.68,21.84 19.68,25.15 19.94,25.4 20.57,25.4 21.34,24.64 22.11,24.64 22.23,24.75 22.23,25.25 22.11,25.36 21.34,25.36 21.21,25.49 21.21,25.68 21.34,25.82 22.11,25.82 22.23,25.93 22.23,26.31 22.11,26.42 21.34,26.42 21.21,26.56 21.21,26.79 21.34,26.93 22.11,26.93 22.23,27.04 22.23,27.27 22.11,27.39 21.34,27.39 21.21,27.52 21.21,27.69 21.34,27.81 22.1,27.81 24.32,30.04 24.32,32.32 23.88,32.77 20.96,32.77 20.68,33.04 U1.16
  BOTTOM w0.114: v1(21.79,21.59) 21.79,19.23 21.96,19.06 21.96,19.06 23.06,17.96 JL1.69
LCD-D3: length 31.1
  TOP w0.114: v1(20.07,24.89) 20.45,24.89 20.57,24.77 20.57,24.38 20.7,24.26 22.49,24.26 22.61,24.37 22.61,27.81 24.7,29.91 24.7,30.64 24.84,30.77 25.39,30.77 25.53,30.91 25.53,31.1 25.39,31.23 24.84,31.23 24.7,31.37 24.7,31.56 24.84,31.69 25.39,31.69 25.53,31.82 25.53,32.01 25.39,32.15 24.84,32.15 24.7,32.28 24.7,32.52 24.82,32.64 25.4,32.64 25.51,32.75 25.51,33.04 25.4,33.15 21.72,33.15 21.59,33.27 21.59,33.4 21.45,33.54 U1.17
  BOTTOM w0.114: JL1.71 23.56,17.94 22.3,19.2 22.3,23.29 20.7,24.89 v1(20.07,24.89)
LCD-D4: length 31.2
  TOP w0.114: v1(20.07,23.5) 20.45,23.88 22.87,23.88 22.99,23.99 22.99,27.69 25.91,30.61 25.91,31.01 26.04,31.14 26.66,31.14 26.8,31.28 26.8,31.47 26.66,31.6 26.04,31.6 25.91,31.73 25.91,31.92 26.04,32.06 26.66,32.06 26.8,32.19 26.8,32.38 26.66,32.51 26.04,32.51 25.91,32.65 25.91,32.91 26.02,33.02 26.67,33.02 26.8,33.15 26.8,33.4 26.67,33.53 21.97,33.53 21.46,34.04 U1.18
  BOTTOM w0.114: v1(20.07,23.5) 21.01,22.56 21.01,18.87 21.56,18.32 JL1.63
LCD-D5: length 31.3
  TOP w0.114: U1.19 21.47,34.54 22.1,33.91 26.99,33.91 27.24,33.66 27.24,31.03 26.69,30.47 26.41,30.47 26.23,30.29 26.23,30.01 26.04,29.83 25.76,29.83 25.58,29.64 25.58,29.37 25.4,29.18 25.12,29.18 24.93,29 24.93,28.72 24.75,28.53 24.47,28.53 24.29,28.35 24.29,28.07 24.1,27.89 23.82,27.89 23.64,27.7 23.64,27.43 23.37,27.15 23.37,23.61 23.25,23.5 22.93,23.5 22.79,23.36 22.79,22.99 22.66,22.86 22.47,22.86 22.34,22.99 22.34,23.36 22.2,23.5 21.46,23.5 21.34,23.37 21.34,22.99 21.21,22.86 20.95,22.86 20.83,22.99 v1(20.83,23.5)
  BOTTOM w0.114: JL1.65 22.06,18.33 21.41,18.97 21.41,22.91 v1(20.83,23.5)
LCD-D6: length 31.2
  TOP w0.114: v1(20.06,22.04) 20.06,22.09 20.45,22.48 23.63,22.48 23.75,22.59 23.75,26.97 26.24,29.46 27.55,29.46 27.66,29.58 27.66,29.84 27.55,29.95 27.18,29.95 27.05,30.08 27.05,30.27 27.18,30.41 27.49,30.41 27.62,30.54 27.62,33.76 27.09,34.29 22.23,34.29 21.47,35.04 U1.20
  BOTTOM w0.114: JL1.57 v1(20.06,22.04)
LCD-D7: length 31.2
  TOP w0.114: U1.21 21.53,35.54 22.4,34.67 27.22,34.67 28.07,33.82 28.07,29.34 27.81,29.08 26.42,29.08 24.26,26.92 24.26,22.23 24.05,22.02 v1(20.62,22.02)
  BOTTOM w0.114: JL1.59 20.56,21.96 v1(20.62,22.02)
LCD-D8: length 31.3
  TOP w0.114: v1(15.37,21.34) 14.99,21.72 14.99,27.94 14.12,28.8 U1.3
  BOTTOM w0.114: v1(15.37,21.34) 15.88,20.83 16.89,20.83 17.02,20.95 17.02,21.34 16.86,21.5 15.88,21.5 15.75,21.63 15.75,21.86 15.86,21.97 16.89,21.97 17.02,22.1 17.02,22.36 16.9,22.48 15.86,22.48 15.75,22.59 15.75,23 15.86,23.11 17.41,23.11 17.53,23 17.53,20.7 17.27,20.45 17.27,20.07 17.53,19.81 17.91,19.81 18.03,19.94 18.03,22.73 18.16,22.86 18.41,22.86 18.56,22.71 JL1.51
LCD-D9: length 31.3
  TOP w0.114: v1(15.37,22.1) 15.37,28.07 14.63,28.81 U1.4
  BOTTOM w0.114: JL1.53 19.06,24.9 18.95,25.02 18.62,25.02 18.49,24.89 18.49,23.31 18.41,23.23 18.15,23.23 18.03,23.35 18.03,24.89 17.9,25.02 17.71,25.02 17.57,24.89 17.57,23.61 17.46,23.5 17.23,23.5 17.12,23.61 17.12,24.89 16.98,25.02 16.64,25.02 16.51,24.89 16.51,23.63 16.4,23.51 15.99,23.51 15.88,23.63 15.88,24.89 15.75,25.02 15.49,25.02 15.37,24.89 v1(15.37,22.1)
LCD-D10: length 31.1
  TOP w0.114: U1.5 15.12,28.82 15.75,28.19 15.75,17.21 15.88,17.07 17.39,17.07 17.53,16.94 17.53,16.75 17.39,16.62 15.88,16.62 15.75,16.48 15.75,16.26 15.88,16.13 18.43,16.13 18.54,16.01 18.54,15.1 18.43,14.99 17.91,14.99 17.78,15.11 17.78,15.49 17.65,15.62 16.35,15.62 16.23,15.51 16.23,15.01 16.32,14.93 17.2,14.93 17.41,14.72 17.41,14.34 17.65,14.1 v1(19.05,14.1)
  BOTTOM w0.114: v1(19.05,14.1) 19.22,14.27 19.57,14.27 19.68,14.16 19.68,13.34 19.06,12.71 JL1.54
LCD-D11: length 31.3
  TOP w0.114: v1(17.93,14.46) 18.55,14.46 18.92,14.83 18.92,16.13 17.63,17.42 16.36,17.42 16.13,17.65 16.13,22.01 16.26,22.15 16.88,22.15 17.02,22.28 17.02,22.47 16.88,22.61 16.26,22.61 16.13,22.74 16.13,22.93 16.26,23.06 16.88,23.06 17.02,23.2 17.02,23.39 16.88,23.52 16.26,23.52 16.13,23.65 16.13,23.84 16.26,23.98 16.88,23.98 17.02,24.11 17.02,24.3 16.88,24.43 16.26,24.43 16.13,24.57 16.13,24.76 16.26,24.89 16.88,24.89 17.02,25.03 17.02,25.21 16.88,25.35 16.26,25.35 16.13,25.48 16.13,25.67 16.26,25.81 16.88,25.81 17.02,25.94 17.02,26.13 16.88,26.26 16.26,26.26 16.13,26.4 16.13,26.59 16.26,26.72 16.88,26.72 17.02,26.85 17.02,27.04 16.88,27.18 16.26,27.18 16.13,27.31 16.13,27.43 16.49,27.8 16.49,27.96 15.63,28.82 U1.6
  BOTTOM w0.114: v1(17.93,14.46) 18.08,14.61 18.55,14.61 18.67,14.49 18.67,13.84 19.05,13.46 19.05,13.19 18.56,12.7 JL1.52
LCD-D12: length 31.1
  TOP w0.114: U1.7 16.12,28.83 17.14,27.81 17.14,27.52 17.4,27.27 17.4,21.84 17.27,21.72 16.64,21.72 16.51,21.59 16.51,21.41 16.64,21.28 17.27,21.28 17.4,21.14 17.4,20.95 17.27,20.82 16.64,20.82 16.51,20.69 16.51,20.32 16.64,20.19 17.28,20.19 17.4,20.08 17.4,19.29 17.28,19.18 16.65,19.18 16.51,19.04 16.51,17.91 16.64,17.78 17.38,17.78 17.51,17.91 17.51,18.66 17.65,18.8 17.84,18.8 17.97,18.66 17.97,17.91 18.11,17.78 19.21,17.78 19.32,17.67 19.32,17.47 19.19,17.33 18.68,17.33 18.54,17.2 18.54,17.01 18.68,16.88 19.19,16.88 19.32,16.74 19.32,16.73 19.46,16.6 19.82,16.6 19.94,16.49 19.94,16.26 19.82,16.14 19.46,16.14 19.32,16.01 19.32,15.82 19.46,15.69 19.93,15.69 20.07,15.55 20.07,15.36 19.93,15.23 19.46,15.23 19.32,15.09 19.32,14.46 19.69,14.1 v1(20.56,14.1)
  BOTTOM w0.114: JL1.60 v1(20.56,14.1)
LCD-D13: length 31.1
  TOP w0.114: v1(19.81,14.61) 20.32,14.61 20.45,14.73 20.45,15.08 20.58,15.21 21.84,15.21 21.97,15.35 21.97,15.53 21.84,15.67 20.58,15.67 20.45,15.8 20.45,16.01 20.56,16.13 21.86,16.13 21.97,16.24 21.97,16.41 21.74,16.64 20.32,16.64 20.19,16.76 20.19,17.03 20.31,17.14 21.72,17.14 21.83,17.26 21.83,17.54 21.72,17.65 19.87,17.65 19.75,17.77 19.75,17.98 19.94,18.16 20.33,18.16 20.45,18.28 20.45,18.55 20.33,18.67 18.54,18.67 17.78,19.43 17.78,27.47 17.6,27.66 17.6,27.87 16.63,28.84 U1.8
  BOTTOM w0.114: v1(19.81,14.61) 20.06,14.36 JL1.58
LCD-D14: length 31.6
  TOP w0.114: U1.9 17.12,28.85 17.94,28.03 17.94,27.8 18.16,27.58 18.16,20.49 18.29,20.35 18.54,20.35 18.67,20.22 18.67,20.03 18.54,19.9 18.29,19.9 18.16,19.76 18.16,19.56 18.67,19.05 18.91,19.05 19.05,19.18 19.05,19.93 19.18,20.07 19.37,20.07 19.5,19.93 19.5,19.18 19.64,19.05 19.83,19.05 19.96,19.18 19.96,19.93 20.1,20.07 20.28,20.07 20.42,19.93 20.42,19.18 20.55,19.05 20.74,19.05 20.88,19.18 20.88,19.93 21.01,20.07 21.2,20.07 21.33,19.93 21.33,19.18 21.47,19.05 22.24,19.05 22.35,18.94 22.35,18.65 22.22,18.51 21.6,18.51 21.46,18.38 21.46,18.19 21.6,18.05 22.22,18.05 22.35,17.92 22.35,15.11 22.1,14.86 21.21,14.86 21.08,14.73 21.08,14.21 21.2,14.1 v1(22.06,14.1)
  BOTTOM w0.114: JL1.66 v1(22.06,14.1)
LCD-D15: length 31.5
  TOP w0.114: v1(21.56,14.48) 23.62,14.48 23.75,14.61 23.75,14.86 23.62,14.99 22.86,14.99 22.73,15.11 22.73,15.48 22.87,15.61 23.87,15.61 24,15.75 24,15.94 23.87,16.07 22.87,16.07 22.73,16.2 22.73,16.83 22.87,16.96 23.36,16.96 23.5,17.1 23.5,17.29 23.36,17.42 22.87,17.42 22.73,17.56 22.73,17.74 22.87,17.88 23.36,17.88 23.5,18.01 23.5,18.2 23.36,18.34 22.87,18.34 22.73,18.47 22.73,19.38 22.6,19.52 21.85,19.52 21.72,19.65 21.72,19.84 21.85,19.97 22.6,19.97 22.73,20.11 22.73,20.32 22.61,20.45 19.3,20.45 18.54,21.21 18.54,27.68 18.28,27.94 18.28,28.2 17.63,28.86 U1.10
  BOTTOM w0.114: JL1.64 v1(21.56,14.48)
LCD-D16: length 36
  TOP w0.114: v1(23.62,12.95) 23.24,12.57 15.66,12.57 11.94,16.29 11.94,26.97 8.75,30.16 8.75,32.78 11.01,35.04 U1.41
  BOTTOM w0.114: JL1.72 23.56,12.89 v1(23.62,12.95)
LCD-D17: length 34
  TOP w0.114: v1(22.99,12.95) 15.81,12.95 12.32,16.45 12.32,27.08 9.09,30.3 9.09,32.61 11.02,34.54 U1.42
  BOTTOM w0.114: v1(22.99,12.95) 23.06,12.88 JL1.70
LCD-D18: length 35
  TOP w0.114: v1(25.15,12.95) 24.26,12.95 23.88,13.34 15.93,13.34 12.7,16.56 12.7,27.2 9.47,30.42 9.47,32.46 11.05,34.04 U1.43
  BOTTOM w0.114: JL1.78 25.06,12.87 v1(25.15,12.95)
LCD-D19: length 33.6
  TOP w0.114: U1.44 11.06,33.54 9.82,32.3 9.82,30.57 13.08,27.3 13.08,16.66 16.03,13.72 24.18,13.72 v1(24.56,13.34)
  BOTTOM w0.114: v1(24.56,13.34) JL1.76
LCD-D20: length 31.3
  TOP w0.114: v1(13.46,22.23) 13.46,27.41 10.16,30.71 10.16,32.13 11.07,33.04 U1.45
  BOTTOM w0.114: v1(13.46,22.23) 13.34,22.35 12.83,22.35 12.7,22.48 12.7,23.39 12.81,23.5 13.2,23.5 13.34,23.64 13.34,23.83 13.2,23.96 12.96,23.96 12.83,24.09 12.83,24.64 13.21,25.02 13.52,25.02 13.65,24.89 13.65,24.14 13.79,24 13.98,24 14.11,24.14 14.11,24.89 14.25,25.02 14.86,25.02 14.99,24.89 14.99,20.81 14.85,20.68 14.61,20.68 14.5,20.56 14.5,20.4 14.61,20.29 16.07,20.29 16.42,19.93 16.42,19.65 16.76,19.3 16.89,19.3 17.65,18.54 17.65,18.03 17.56,17.94 JL1.47
LCD-D21: length 31.2
  TOP w0.114: U1.46 11.07,32.54 10.52,31.98 10.52,30.86 13.84,27.53 13.84,21.21 v1(13.46,20.83)
  BOTTOM w0.114: v1(13.46,20.83) 13.46,20.43 13.58,20.32 13.97,20.32 14.1,20.45 14.1,20.95 14.22,21.08 14.48,21.08 14.61,21.21 14.61,23.37 14.48,23.5 14.1,23.5 13.97,23.37 13.97,21.46 13.84,21.34 13.46,21.34 13.34,21.46 13.34,21.84 13.22,21.95 12.81,21.95 12.7,21.84 12.7,20.19 12.95,19.94 15.49,19.94 16.51,18.92 16.79,18.92 17.27,18.44 17.27,18.14 17.06,17.92 JL1.45
LCD-D22: length 31.1
  TOP w0.114: v1(17.02,14.1) 16.13,14.1 15.49,14.74 15.49,14.93 15.31,15.11 15.12,15.11 14.22,16.01 14.22,16.32 14.09,16.46 13.85,16.46 13.72,16.59 13.72,16.78 13.85,16.91 14.36,16.91 14.48,17.03 14.48,17.27 14.39,17.36 13.6,17.36 13.46,17.5 13.46,17.69 13.6,17.82 14.39,17.82 14.48,17.91 14.48,18.81 14.36,18.92 13.58,18.92 13.46,19.04 13.46,19.82 13.6,19.95 14.09,19.95 14.22,20.08 14.22,27.66 10.86,31.03 10.86,31.76 11.14,32.04 U1.47
  BOTTOM w0.114: JL1.48 17.56,12.7 17.69,12.83 18.16,12.83 18.59,13.25 18.59,13.42 18.29,13.72 18.29,13.98 18.17,14.1 17.67,14.1 17.56,14.21 17.56,14.44 17.4,14.61 17.02,14.61 16.91,14.49 16.91,14.21 v1(17.02,14.1)
LCD-D23: length 31.6
  TOP w0.114: U1.48 11.32,31.54 11.2,31.43 11.2,31.19 14.61,27.79 14.61,20.33 14.74,20.19 15.11,20.19 15.24,20.06 15.24,19.87 15.11,19.74 14.74,19.74 14.61,19.6 14.61,19.42 14.72,19.3 15.25,19.3 15.37,19.19 15.37,19.03 15.25,18.91 15.1,18.91 14.99,18.8 14.99,18.2 14.85,18.07 14.85,17.78 14.97,17.66 15.25,17.66 15.37,17.55 15.37,17.39 15.25,17.27 14.97,17.27 14.86,17.16 14.86,16.89 14.98,16.77 15.25,16.77 15.37,16.66 15.37,16.5 15.25,16.38 14.72,16.38 14.61,16.27 14.61,16.11 15.22,15.49 15.76,15.49 15.88,15.38 15.88,14.86 16.26,14.48 v1(16.51,14.48)
  BOTTOM w0.114: JL1.46 17.06,12.79 17.02,12.83 16.38,12.83 16,13.21 16,13.46 16.13,13.59 16.38,13.59 16.74,13.23 17.67,13.23 17.78,13.35 17.78,13.59 17.65,13.72 16.76,13.72 16.51,13.97 15.99,13.97 15.88,14.08 15.88,14.49 15.99,14.61 16.38,14.61 v1(16.51,14.48)
LCD-DE: length 23.6
  TOP w0.102: U1.11 18.12,29.33 R87.1
  TOP w0.114: R87.1 18.63,28.11 v1(18.67,28.07)
  BOTTOM w0.114: v1(18.67,28.07) 11.94,28.07 11.05,27.18 11.05,21.46 11.3,21.21 11.3,18.92 11.56,18.67 14.61,18.67 14.86,18.41 14.86,18.16 15.06,17.96 JL1.37
LCD-HSYNC: length 53.5
  TOP w0.114: GU4.2 22.86,46.35 23.11,46.1 24.38,46.1 24.64,46.35 25.53,46.35 25.91,45.97 25.91,44.81 26.01,44.7 26.92,44.7 28.07,43.56 v1(28.07,43.18)
  BOTTOM w0.114: v1(28.07,43.18) 27.94,43.05 27.94,35.43 26.67,34.16 26.67,29.08 24.41,26.82 24.41,20.93 26.54,18.8 26.54,17.91 27.43,17.02 27.43,16.38 26.67,15.62 25.15,15.62 24.51,14.99 15.62,14.99 15.49,14.86 15.49,13.21 16.06,12.64 JL1.42
LCD-VSYNC: length 48.6
  TOP w0.114: v1(28.32,44.2) 28.32,46.1 28.07,46.35 GU3.2
  BOTTOM w0.114: v1(28.32,44.2) 27.58,43.46 27.58,35.58 26.31,34.31 26.31,29.23 24.05,26.97 24.05,20.78 26.16,18.67 26.16,16.26 25.91,16 25.02,16 24.36,15.34 15.34,15.34 15.11,15.11 15.11,13.08 15.56,12.63 JL1.40
Net_2:
  vias: v1(15.37,20.7)
RGB/CLK: length 2.5
  TOP w0.114: U1.24 21.5,37.04 C266.1 R78.2
VGA-B: length 14.5
  TOP w0.114: U1.28 17.12,39.07 18.16,40.11 18.16,43.64 15.96,45.84 R91.1 ESDA1.1 15.96,51.27 J15.3
VGA-G: length 13.6
  TOP w0.114: J15.2 14.05,51.22 ESDA2.1 R92.1 14.05,46.4 14.99,45.47 14.99,39.75 15.12,39.61 U1.32
VGA-HSYNC: length 17.2
  TOP w0.102: ESDA5.1 18.69,47.3 GU4.4
  TOP w0.114: ESDA5.1 18.67,48.13 18.92,48.39 21.23,48.39 21.97,49.12 21.97,53.52 20.24,55.24 17.39,55.24 J15.13
VGA-R: length 14.2
  TOP w0.114: J15.1 12.15,50.83 ESDA3.1 R90.1 12.15,46.27 14.22,44.2 14.22,39.22 14.12,39.12 U1.34
VGA-VSYNC: length 15.8
  TOP w0.102: ESDA4.1 23.83,47.54 24.07,47.3 GU3.4
  TOP w0.114: ESDA4.1 23.5,48.08 22.35,49.23 22.35,56.64 21.34,57.66 19.56,57.66 J15.14
N34352813: length 1.9
  TOP w0.114: C21.1 13.46,39.37 13.63,39.21 U1.35
N34352829: length 2.1
  TOP w0.114: C22.1 12.57,39.75 13.12,39.2 U1.36
N34352843: length 1.7
  TOP w0.102: R88.1 10.29,37.04 U1.37
N34352862: length 1.8
  TOP w0.102: U1.38 11.01,36.54 10.67,36.2 R89.1
N34482451: length 2.2
  BOTTOM w0.114: JL1.15 9.56,17.94 10.12,18.5 10.12,18.53 10.67,19.08 R1.1

## Copper pours and planes (outline as drawn; the poured copper is in the pictures)
GND on TOP: 29.72,64.9 1.91,64.9 0.51,63.5 0.51,1.91 1.91,0.51 29.84,0.51 31.24,1.91 31.24,63.37 ; 3 cut-outs
GND on BOTTOM: 29.84,64.9 1.91,64.9 0.51,63.5 0.51,1.91 1.91,0.51 29.84,0.51 31.24,1.91 31.24,63.5 ; 1 cut-out
GND on GND02, GND03: 30.81,0.94 29.53,0.51 29.5,0.51 1.81,0.51 0.81,1.1 0.51,2.22 0.51,2.25 0.51,63.15 0.51,63.19 0.94,64.47 2.22,64.9 2.25,64.9 29.5,64.9 29.53,64.9 30.81,64.47 31.24,63.19 31.24,63.15 31.24,2.25 31.24,2.22
VCC-5V on BOTTOM: 12.06,12.7 11.05,12.7 10.92,12.57 10.92,10.16 10.79,10.03 10.79,8.51 12.45,6.86 12.45,1.52 12.7,1.27 14.1,1.27 14.35,1.52 14.35,7.37 12.19,9.53 12.19,12.57
DCIN-12V on BOTTOM: 8.13,12.7 5.97,12.7 5.84,12.57 5.84,9.14 6.99,8 8.89,8 10.16,6.73 10.16,4.83 9.91,4.57 9.91,1.4 10.03,1.27 11.56,1.27 11.68,1.4 11.68,6.48 8.26,9.91 8.26,12.57
GM7123C-3V3 on TOP: 7.49,19.43 6.48,19.43 6.35,19.56 6.35,22.48 7.37,23.5 7.37,26.92 4.19,30.1 4.19,43.94 4.95,44.7 12.19,44.7 13.72,43.18 13.72,42.67 13.46,42.42 12.95,42.42 11.68,43.69 5.46,43.69 5.21,43.43 5.21,30.61 8.38,27.43 8.38,22.48 7.62,21.72 7.62,19.56
GM7123C-3V3 on BOTTOM: 6.48,16.76 7.11,16.76 7.24,16.89 7.24,17.91 7.11,18.03 7.11,20.45 6.99,20.57 6.48,20.57 6.35,20.45 6.35,16.89
GM7123C-3V3 on BOTTOM: 12.95,43.56 16.76,43.56 16.89,43.43 16.89,42.55 16.76,42.42 12.95,42.42 12.83,42.55 12.83,43.43

## Text on the board
Ref Des/Silkscreen Top: SUB_GM7123C_RGB TO VGA_V1.0 | 2023-07-17
